# Altium PCB BOB_PAC5527.PcbDoc (part 3 of 3)
Units mm, origin at the board's own origin, x right, y up, seen from the top; angles counter-clockwise.
Board outline 40 x 40 mm, 2 copper layers (Top Layer, Bottom Layer), stack 1.448 mm thick; 84 components, 61 nets, 272 pads, 317 vias.
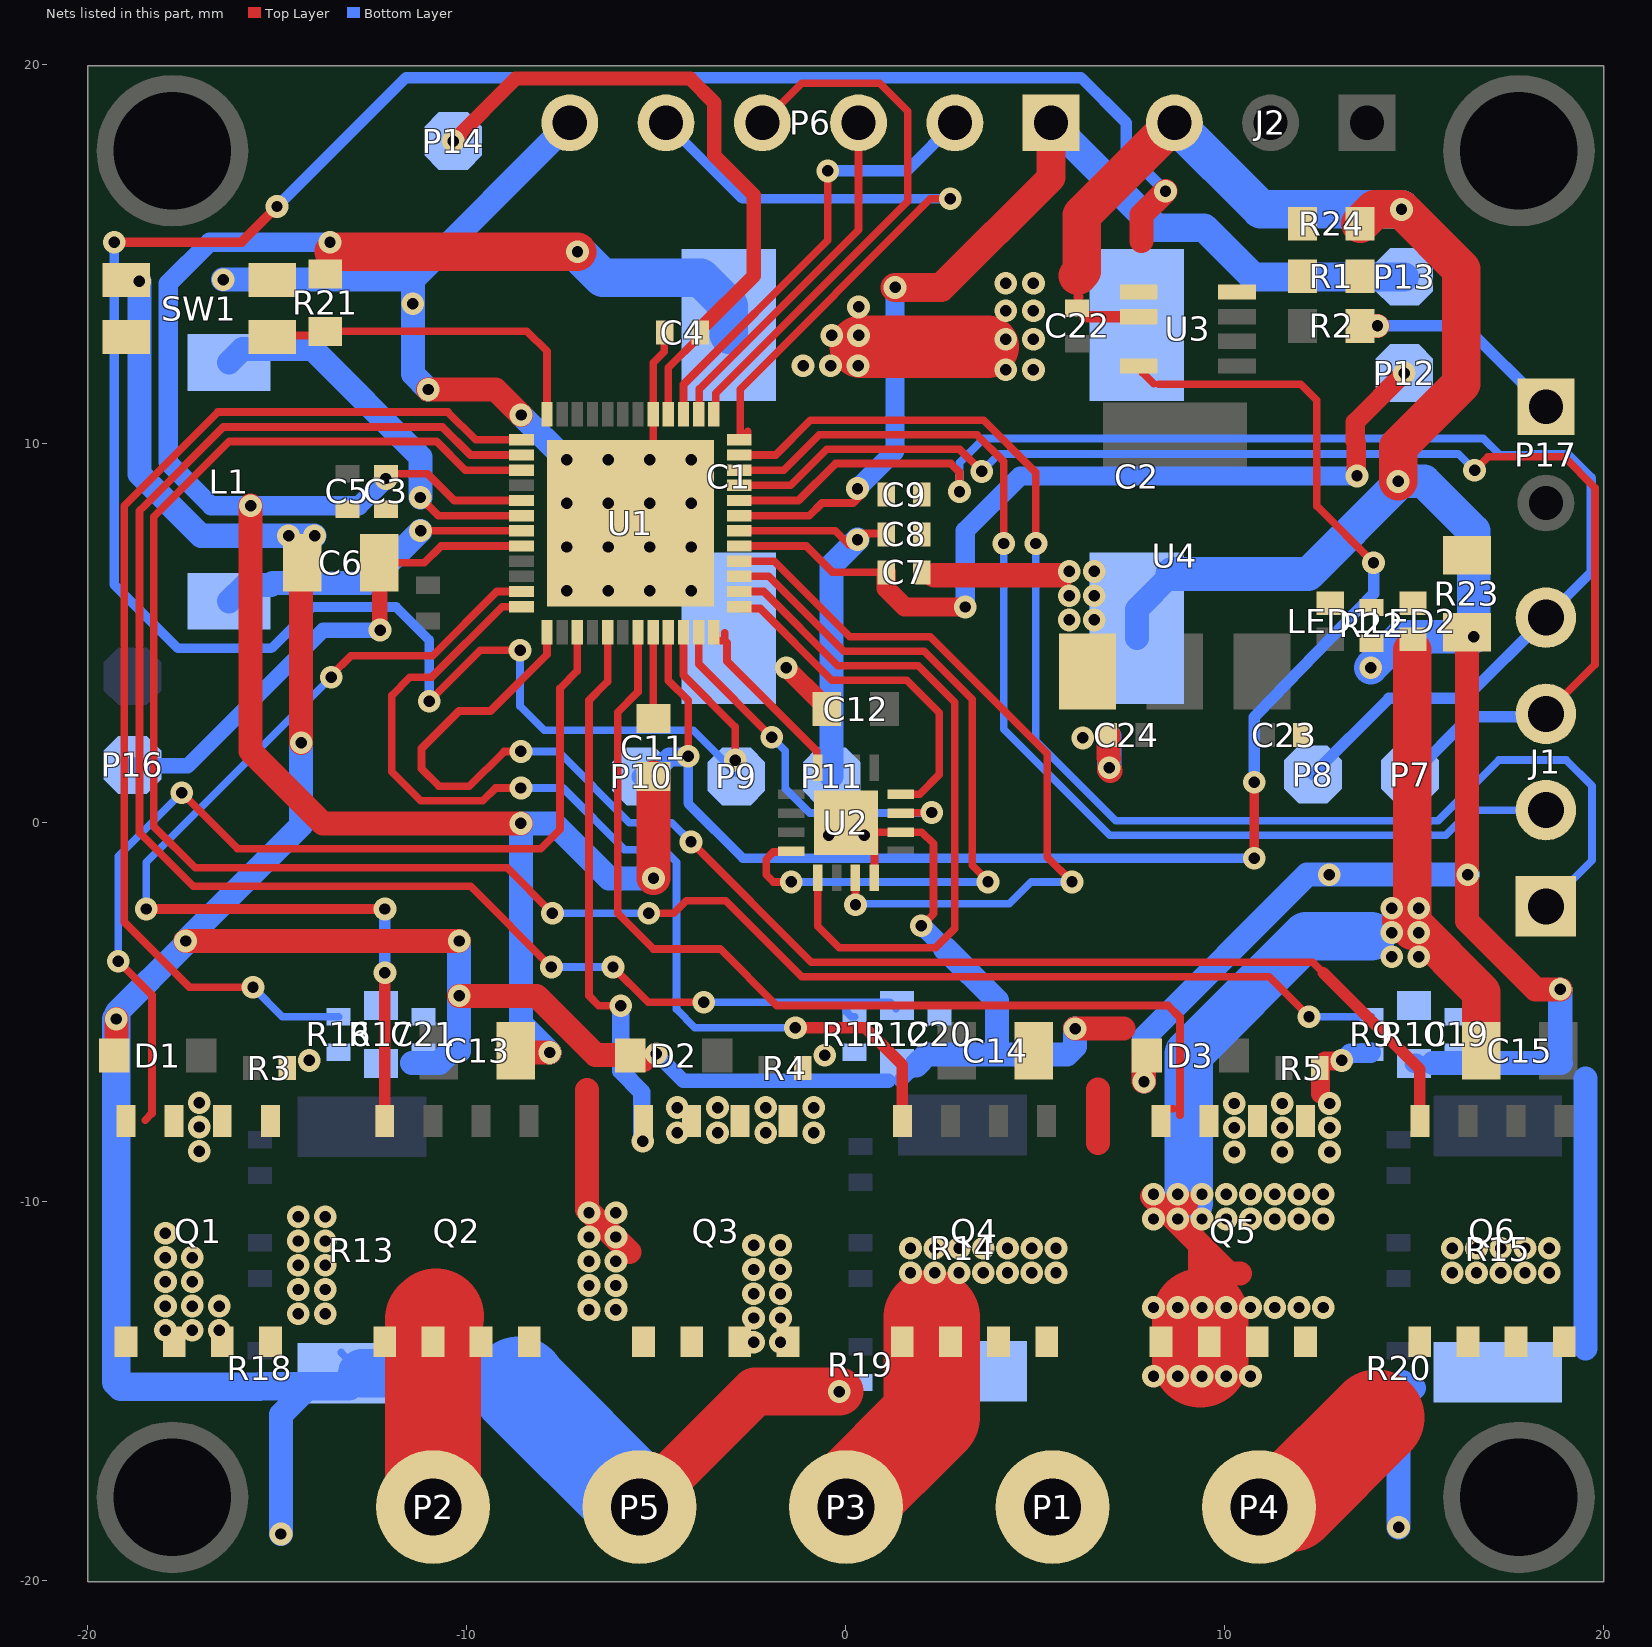
[diagram p2: the nets of this part, all layers, seen from the top]

## Via types
v1: diameter 0.6, hole 0.3, Top Layer to Bottom Layer, 182 vias
v2: diameter 0.6, hole 0.3, Top Layer to Bottom Layer, tented both sides, 135 vias

## Nets (pads, with @x,y where several pads share a name; then routed paths per layer and width w, separated by ;. In a path a pad name is that pad's centre, name@x,y a point inside that pad or via, vN(x,y) a via of type N, cw(c..) or ccw(c..) an arc to the next point about the centre after c; other vN are vias at no path point) (continued)
GND: C1.2 C2.2 C3.2 C4.2 C5.2 C6.2 C7.2 C8.2 C9.2 C12.2 C19.1 C20.1 C21.1 C22.2 C23.2 C24.2 D1.2 D2.2 D3.2 J2.3 P5.1 P6.6 R1.1 R10.2 R12.2 R13.2 R14.2 R15.2 R17.2 R18.1 R19.1 R20.1 R22.2 R23.2 R24.1 SW1.1 U1.5 U1.49 U2.8 U2.10 U2.17 U3.2 U4.1 | length 211.1
  Top Layer w0.203: U1.49@-5.688,8.226 U1.49@-5.088,8.826 ; U1.49@-5.088,8.499 U1.49@-5.088,8.826 ; C4.2@-4.794,13.086 -4.799,13.08 -4.799,12.425 -5.088,12.137 U1.5@-5.088,10.774 U1.49@-5.088,8.826 ; U2.17@-0.269,-0.212 U2.17@0.231,-0.712 ; U2.8@0.75,-1.45 0.75,-0.25 U2.10@1.45,-0.25 2.003,-0.25 2.311,-0.559 2.311,-2.4 v2(1.989,-2.723) ; 6.098,13.868 6.161,13.868
  Top Layer w0.305: C22.2@6.301,13.35 U3.2@7.724,13.35
  Top Layer w0.508: v2(-1.575,4.089) -0.673,3.188 -0.635,3.188 -0.508,3.061 C12.2@-0.508,3.023 ; v2(13.843,4.089) 13.868,4.089 v2@13.894,4.064 ; R23.2@16.383,4.621 16.385,4.623 16.385,4.726 v2(16.561,4.902)
  Top Layer w0.635: D1.2@-19.309,-6.147 -19.253,-6.091 v2(-19.253,-5.182) ; v2(-17.424,-3.124) v2(-10.206,-3.124) ; C6.2@-14.426,6.96 -14.376,6.91 v2(-14.376,2.108) ; v2(-11.024,11.43) -9.246,11.43 v2(-8.572,10.757) ; v2(-10.206,-4.569) -8.164,-4.569 -6.604,-6.129 -5.712,-6.129 D2.2@-5.695,-6.147 ; D2.2@-5.695,-6.236 -5.695,-6.261 D2.2@-5.339,-6.261 ; 2.318,6.528 v1@5.715,6.528 ; v2(6.045,-5.436) 7.325,-5.436 ; C24.2@6.921,2.311 6.921,1.718 v1@6.934,1.705 ; v1(6.945,1.448) 6.945,1.386 v1@6.972,1.359 ; v2(7.861,-6.833) 7.856,-6.827 7.856,-6.095 D3.2@7.882,-6.121 ; R23.2@16.383,4.621 16.383,-2.591 18.19,-4.398 v2(18.845,-4.398)
  Top Layer w1.016: 6.111,14.435 6.225,14.549 6.225,16.027 J2.3@8.663,18.466 J2.3@8.532,18.466 ; R24.1@13.566,15.799 13.947,16.18 v2(14.656,16.18) 16.231,14.605 16.231,11.582 14.567,9.919 v2(14.567,9.004)
  Top Layer w1.27: P5.1@-5.446,-18.059 -2.398,-15.011 v2(-0.178,-15.011)
  Bottom Layer w0.203: R13.2@-13.319,-13.983 R13.2@-12.774,-14.528
  Bottom Layer w0.381: v1(-5.004,-6.096) -4.293,-6.807 1.118,-6.807 ; 1.448,-6.794 1.854,-6.388
  Bottom Layer w0.508: v2(1.989,-2.723) 2.013,-2.723 2.618,-3.327 ; R10.2@14.986,-6.35 R10.2@15.05,-6.35 ; 18.845,-6.323 18.86,-6.337
  Bottom Layer w0.635: v2(-19.253,-5.182) -19.253,-5.029 -17.424,-3.2 v2(-17.424,-3.124) -14.376,-0.076 v2(-14.376,2.108) ; v2(-18.644,14.281) -18.644,9.195 -17.018,7.569 v2(-14.707,7.569) v2(-14.021,7.569) ; v2(-16.434,14.326) -11.428,14.326 ; R18.1@-15.481,-14.884 R18.1@-15.469,-14.872 ; v2(-14.91,-18.771) -14.91,-15.621 R13.2@-14.199,-14.91 ; R13.2@-13.118,-14.872 R13.2@-12.774,-14.528 ; -11.455,-6.337 -10.731,-6.337 -10.503,-6.109 ; v2(-11.024,11.43) -11.428,11.834 -11.428,13.663 -11.428,14.326 ; -10.206,-6.02 v2(-10.206,-4.569) v2(-10.206,-3.124) ; v2(-8.572,10.757) -7.391,9.576 v2(-7.364,9.576) ; P6.6@-7.288,18.466 -11.428,14.326 ; 1.854,-6.401 2.134,-6.121 3.981,-6.121 ; 2.618,-3.327 3.981,-4.691 3.981,-6.121 ; R14.2@2.707,-14.872 R14.2@3.075,-14.503 ; v2(6.045,-5.436) 6.045,-5.905 5.829,-6.121 3.981,-6.121 ; 6.921,2.311 6.945,2.288 v1(6.945,1.448) ; C2.2@7.673,4.877 C2.2@7.673,5.131 7.673,5.627 C2.2@8.605,6.559 ; v2(7.861,-6.833) 7.861,-5.679 12.168,-1.372 v2(12.751,-1.372) v2(16.408,-1.372) ; v2(14.58,-18.593) 14.58,-15.075 14.732,-14.922 14.986,-14.922 ; R20.1@14.681,-14.872 R20.1@14.681,-14.757 ; 15.494,-6.337 18.86,-6.337 ; 18.845,-6.323 v2(18.845,-4.398) ; 19.507,-13.87 19.507,-6.756
  Bottom Layer w0.762: v2(-19.253,-5.182) -19.253,-14.757 -19.126,-14.884 R18.1@-15.481,-14.884 ; R18.1@-15.469,-14.872 R13.2@-13.118,-14.872
  Bottom Layer w0.889: C2.2@8.605,6.559 12.197,6.559 14.567,8.929 v2(14.567,9.004) 15.253,9.004 16.561,7.696 v2(16.561,4.902) 14.656,4.902 v2(13.843,4.089)
  Bottom Layer w1.016: J2.3@8.663,18.466 10.949,16.18 v2(14.656,16.18)
  Bottom Layer w1.27: R13.2@-12.774,-14.528 -11.011,-14.528
  Bottom Layer w2.54: -8.636,-14.834 -8.636,-14.87 P5.1@-5.446,-18.059
  other v1: 6.248,2.235 5.893,5.35 6.553,5.35 5.893,5.99 6.553,5.99 5.893,6.629 6.553,6.629 -11.43,13.691
  other v2: -0.457,-0.335 0.483,-0.335 -7.364,6.121 -6.272,6.121 -5.18,6.121 -4.087,6.121 -7.364,7.273 -6.272,7.273 -5.18,7.273 -4.087,7.273 -7.364,8.424 -6.272,8.424 -5.18,8.424 -4.087,8.424 -6.272,9.576 -5.18,9.576 -4.087,9.576
HEADER_JUMPER: P17.1 R2.2 | length 5.8
  Top Layer w0.635: R2.2@13.566,13.106 v2(14.023,13.106)
  Bottom Layer w0.305: v2(14.023,13.106) 16.334,13.106 P17.1@18.468,10.973
MGH: U1.36 U2.16 | length 5
  Top Layer w0.203: U1.36@-3.488,5.024 -3.439,4.976 -3.439,4.801 -3.264,4.801 ; -3.201,5.002 -3.201,4.801 -3.193,4.801 -3.14,4.748 -3.14,4.258 -0.773,1.891 -0.773,1.473 U2.16@-0.75,1.45
MGL: U1.35 U2.11 | length 10.1
  Top Layer w0.203: U1.35@-3.888,5.024 -3.888,4.186 v2(-1.958,2.256) ; v2@-1.928,2.286 v2@-1.76,2.286 ; U2.11@1.509,0.252 1.516,0.259 2.255,0.259 v2(2.263,0.267)
  Bottom Layer w0.203: v2(-1.958,2.256) -1.6,1.898 -1.6,0.9 -0.954,0.254 2.25,0.254 v2(2.263,0.267)
NetLED1_2: LED1.2 R22.1
NetLED2_2: LED2.2 R23.1
PD6: P9.1 U1.34 U3.1 | length 68.1
  Top Layer w0.203: v2(-10.998,3.2) -9.652,4.547 v2(-8.599,4.547) ; U1.34@-4.288,5.024 -4.288,3.889 -2.921,2.522 v2(-2.921,1.651)
  Top Layer w0.254: v2(-19.304,15.316) -15.951,15.316 v2(-15.011,16.256)
  Top Layer w0.305: U3.1@7.724,14 U3.1@7.749,14.026
  Top Layer w0.635: 7.8,15.342 7.8,16.029 v2(8.431,16.661)
  Bottom Layer w0.203: v2(-8.599,4.547) -8.599,3.073 -7.964,2.438 -4.032,2.438 P9.1@-2.894,1.3
  Bottom Layer w0.254: v2(-19.304,15.316) -19.304,6.274 -17.628,4.597 -15.164,4.597 -14.072,5.69 -11.869,5.69 -10.998,4.819 v2(-10.998,3.2)
  Bottom Layer w0.305: v2(-15.011,16.256) -11.608,19.66 6.2,19.66 7.393,18.466 7.393,17.699 v2(8.431,16.661)
PD7: P10.1 U1.33 U3.4 | length 40.9
  Top Layer w0.203: U1.33@-4.688,5.024 -4.688,3.75 -4.166,3.228 v2(-4.166,1.753) ; U3.4@7.724,12.05 U3.4@8.002,12.05 ; U3.4@7.825,11.874 8.117,11.582 ; 8.257,11.57 11.997,11.57 12.421,11.146 12.421,8.357 v2(13.919,6.858)
  Top Layer w0.254: v2@10.77,-1.092 v2(10.77,-0.94) v2(10.77,1.067)
  Bottom Layer w0.254: v2(-4.166,1.753) -4.166,0.508 -2.718,-0.94 v2(10.77,-0.94)
  Bottom Layer w0.305: v2(10.77,1.067) 10.77,2.78 10.854,2.868 cw(c11.074,2.657) 10.856,2.87 13.919,6.042 v2(13.919,6.858)
  Bottom Layer w0.508: P10.1@-5.408,1.219 -5.176,1.219 -4.66,1.735 -4.183,1.735 v2(-4.166,1.753)
PE0: U1.37 U2.12 | length 9.3
  Top Layer w0.203: U1.37@-2.813,5.699 -2.764,5.651 -2.264,5.651 -0.372,3.759 1.6,3.759 2.464,2.896 2.464,1.27 1.947,0.753 1.453,0.753 U2.12@1.45,0.75
PE1: U1.38 U2.5 | length 18.2
  Top Layer w0.203: U1.38@-2.813,6.099 -2.173,6.099 -0.214,4.14 1.905,4.14 2.872,3.173 2.872,-2.792 2.362,-3.302 -0.178,-3.302 -0.744,-2.736 U2.5@-0.744,-1.483
PE2: U1.39 U2.4 | length 19.6
  Top Layer w0.203: U1.39@-2.813,6.499 -2.034,6.499 -0.056,4.521 2.063,4.521 3.327,3.257 3.327,-1.128 3.746,-1.547 v2(3.746,-1.564) ; U2.4@-1.45,-0.75 -1.473,-0.773 -1.916,-0.773 -2.106,-0.963 -2.106,-1.374 -1.916,-1.564 v2(-1.446,-1.564)
  Bottom Layer w0.203: v2@-1.435,-1.564 v2(3.746,-1.564)
PE3: U1.40 U2.7 | length 20.6
  Top Layer w0.203: U1.40@-2.813,6.899 -1.896,6.899 0.102,4.902 2.221,4.902 5.309,1.815 5.309,-0.908 v2(5.964,-1.564) ; U2.7@0.25,-1.45 U2.7@0.25,-1.45 0.251,-2.163 v2(0.252,-2.164) ; v2@0.251,-2.239 0.252,-2.24 v2@0.252,-2.316
  Bottom Layer w0.203: v2(0.252,-2.164) 0.273,-2.143 4.308,-2.143 4.888,-1.564 v2(5.964,-1.564)
PF0: P6.2 U1.3 | length 11.8
  Top Layer w0.203: U1.3@-4.288,10.998 -4.288,11.56 -0.481,15.367 v2(-0.481,17.196)
  Bottom Layer w0.203: P6.2@2.948,18.542 P6.2@2.948,18.61
  Bottom Layer w0.305: v2(-0.481,17.196) 1.602,17.196 P6.2@2.948,18.542
PF1: P6.3 U1.2 | length 9.4
  Top Layer w0.203: U1.2@-3.888,10.774 -3.869,10.793 -3.869,11.44 0.332,15.641 P6.3@0.332,18.466
PF2: P6.4 U1.1 | length 14.7
  Top Layer w0.203: U1.1@-3.488,10.774 -3.439,10.823 -3.439,11.33 1.628,16.397 1.628,18.765 0.886,19.507 -1.166,19.507 P6.4@-2.208,18.466
PF3: P6.5 U1.48 | length 17.5
  Top Layer w0.203: U1.48@-2.813,10.099 -2.638,10.099 -2.589,10.148 -2.589,10.323 ; -2.794,10.287 -2.794,11.437 2.228,16.459 v2(2.75,16.459)
  Bottom Layer w0.254: P6.5@-4.748,18.466 -2.741,16.459 v2(2.75,16.459)
PF4: J1.1 U1.47 | length 36
  Top Layer w0.203: U1.47@-2.813,9.699 -1.856,9.699 -0.938,10.617 3.632,10.617 5.011,9.239 v2(5.011,7.366)
  Bottom Layer w0.203: v2(5.011,7.366) 5.011,2.158 7.117,0.051 15.621,0.051 17.221,1.651 19.001,1.651 19.685,0.967 19.685,-0.993 J1.1@18.468,-2.21
PF5: J1.2 U1.46 | length 30.5
  Top Layer w0.203: U1.46@-2.813,9.299 -1.646,9.299 -0.709,10.236 3.454,10.236 4.162,9.528 v2(4.162,7.366)
  Bottom Layer w0.203: v2(4.162,7.366) 4.162,2.467 6.96,-0.33 15.824,-0.33 16.485,0.33 J1.2@18.468,0.33
PF6: J1.3 P7.1 U1.45 | length 34.8
  Top Layer w0.203: U1.45@-2.813,8.899 -1.462,8.899 -0.506,9.855 2.995,9.855 v2(3.583,9.268) ; v2(16.586,9.296) 16.942,9.652 18.948,9.652 19.761,8.839 19.761,4.164 J1.3@18.468,2.87
  Bottom Layer w0.203: v2(3.583,9.268) 4.043,9.728 16.154,9.728 v2(16.586,9.296)
  Bottom Layer w0.305: P7.1@14.911,1.246 16.459,2.794 18.392,2.794 J1.3@18.468,2.87
PF7: J1.4 P8.1 U1.44 | length 37
  Top Layer w0.203: U1.44@-2.813,8.499 -1.252,8.499 -0.277,9.474 2.769,9.474 2.994,9.249 v2(2.994,8.734)
  Bottom Layer w0.203: v2(2.994,8.734) 2.994,9.498 3.63,10.135 16.815,10.135 17.247,9.703 18.148,9.703
  Bottom Layer w0.254: 18.148,9.703 19.05,9.703 19.66,9.093 19.66,6.602 J1.4@18.468,5.41
  Bottom Layer w0.305: P8.1@12.319,1.27 14.326,3.277 16.334,3.277 J1.4@18.468,5.41
RESET: R21.2 SW1.2 U1.12 | length 9.2
  Top Layer w0.203: SW1.2@-15.142,12.852 -13.739,12.852 -13.625,12.967 -8.42,12.967 -7.888,12.434 U1.12@-7.888,10.774
RS: R1.2 R24.2 U3.8
SW1: L1.1 U1.18 | length 10.3
  Top Layer w0.203: v2(-11.232,8.578) -10.753,8.099 U1.18@-8.563,8.099
  Bottom Layer w0.635: L1.1@-16.279,12.142 -15.924,12.497 -14.072,12.497 -11.225,9.65 -11.225,8.585 v2(-11.232,8.578)
SW2: L1.2 U1.19 | length 8.5
  Top Layer w0.203: v2(-11.225,7.699) U1.19@-8.563,7.699
  Bottom Layer w0.635: L1.2@-16.279,5.842 -15.847,6.274 -15.175,6.274 -15.125,6.325 -12.6,6.325 v2(-11.225,7.699)
U_OUT: P2.1 Q1.1 Q1.2 Q1.3 Q2.5 Q2.6 Q2.7 Q2.8 R3.1 R16.2 | length 5.1
  Top Layer w2.54: P2.1@-10.895,-18.059 -10.895,-13.104 -10.82,-13.03
  other v1: -17.064,-8.671 -17.064,-8.031 -17.064,-7.391 -14.16,-6.274
UH: Q1.4 U1.27 | length 26
  Top Layer w0.203: v2(-19.202,-3.658) -18.313,-4.547 -18.313,-7.673 -18.489,-7.849 ; v2(-17.526,0.787) -16.053,-0.686 -8.052,-0.686 -7.544,-0.178 -7.544,3.548 -7.088,4.004 U1.27@-7.088,5.024
  Bottom Layer w0.203: v2(-19.202,-3.658) -19.202,-0.889 v2(-17.526,0.787)
UL: Q2.4 U1.23 | length 26
  Top Layer w0.203: v2(-13.581,3.835) -13.581,3.885 -13.061,4.405 -10.906,4.405 -9.211,6.099 U1.23@-8.563,6.099
  Top Layer w0.254: v2(-18.466,-2.278) v2(-12.167,-2.278)
  Top Layer w0.305: Q2.4@-12.17,-7.874 -12.17,-3.962 v2(-12.167,-3.959)
  Bottom Layer w0.203: v2(-18.466,-2.278) -18.466,-1.049 v2(-13.581,3.835)
  Bottom Layer w0.305: v2(-12.167,-3.959) v2(-12.167,-2.278)
UVDC: C21.2 R16.1 R17.1 U1.13 | length 29.5
  Top Layer w0.203: v2(-15.646,-4.343) -17.323,-4.343 -19.045,-2.621 -19.045,8.361 -16.573,10.833 -10.503,10.833 -9.769,10.099 U1.13@-8.563,10.099
  Bottom Layer w0.203: v2(-15.646,-4.343) -14.872,-5.118 R16.1@-13.386,-5.118
V_OUT: P3.1 Q3.1 Q3.2 Q3.3 Q4.5 Q4.6 Q4.7 Q4.8 R4.1 R11.2 | length 5.9
  Top Layer w2.54: P3.1@0.002,-18.059 0.002,-17.935 2.261,-15.676 2.261,-13.056
  other v1: 1.702,-11.879 2.342,-11.879 2.981,-11.879 3.621,-11.879 4.261,-11.879 4.901,-11.879 5.541,-11.879 1.702,-11.227 2.342,-11.227 2.981,-11.227 3.621,-11.227 4.261,-11.227 4.901,-11.227 5.541,-11.227 -4.45,-8.184 -3.388,-8.184 -2.118,-8.184 -0.848,-8.184 -4.45,-7.518 -3.388,-7.518 -2.118,-7.518 -0.848,-7.518
  other v2: -0.559,-6.139
VCC_1V8: C7.1 P12.1 U1.41 | length 23.1
  Top Layer w0.203: U1.41@-2.813,7.299 -1.051,7.299 -0.356,6.604 C7.1@1.061,6.604
  Top Layer w0.508: C7.1@1.061,6.604 1.061,6.178 1.549,5.69 v2(3.15,5.69) ; v2(13.483,9.149) 13.465,9.166 13.465,10.03 13.437,10.058 13.437,10.566 v2(14.732,11.862)
  Bottom Layer w0.508: v2(3.15,5.69) 3.15,7.699 4.599,9.149 v2(13.483,9.149)
VCC_3V3: C4.1 P14.1 U1.4 | length 17.4
  Top Layer w0.203: U1.4@-4.688,10.774 -4.688,11.998 -3.846,12.84 C4.1@-3.846,12.929
  Top Layer w0.305: C4.1@-3.846,12.929 C4.1@-3.846,13.018
  Top Layer w0.381: v2(-10.363,17.983) -8.712,19.634 -4.115,19.634 -3.48,18.999 -3.48,17.602 -2.438,16.561 -2.438,14.425 C4.1@-3.846,13.018
VCC_IO: C9.1 P6.1 P13.1 U1.43 | length 27.1
  Top Layer w0.203: U1.43@-2.813,8.099 -0.966,8.099 -0.633,8.433 0.191,8.433 0.376,8.618 0.305,8.689 v2(0.305,8.814)
  Top Layer w0.762: v2(1.295,14.122) 2.515,14.122 5.411,17.019 P6.1@5.412,18.466
  Bottom Layer w0.508: v2(0.305,8.814) 1.295,9.804 v2(1.295,14.122)
  Bottom Layer w0.762: P6.1@5.412,18.466 8.181,15.697 9.449,15.697 10.744,14.402 P13.1@14.732,14.402
VCC_VCORE: C8.1 P11.1 U1.42 | length 10.7
  Top Layer w0.203: U1.42@-2.813,7.699 -0.288,7.699 0.07,7.341 v2@0.076,7.341 ; v2@0.101,7.341 v2@0.076,7.341 ; v2@0.362,7.627 v2@0.076,7.341 ; v2@0.388,7.627 1.039,7.627 C8.1@1.061,7.606
  Bottom Layer w0.635: P11.1@-0.379,1.219 -0.379,6.784 v2(0.305,7.468)
VCP: C11.1 U1.32 | length 2.3
  Top Layer w0.203: U1.32@-5.088,5.024 -5.088,2.751 C11.1@-5.08,2.743
VH: Q3.4 U1.29 | length 15.1
  Top Layer w0.203: U1.29@-6.288,5.024 -6.288,3.726 -6.364,3.65 -6.782,3.232 -6.782,-4.568 -6.52,-4.83 v2(-5.946,-4.83)
  Top Layer w0.457: v1(-5.359,-8.407) -5.351,-8.399 -5.351,-7.883 Q3.4@-5.342,-7.874
  Bottom Layer w0.457: v2(-5.946,-4.83) -5.946,-6.551 -5.387,-7.11 -5.387,-8.38 v1(-5.359,-8.407)
VL: Q4.4 U1.24 | length 27.1
  Top Layer w0.203: v2(-8.577,0.914) -9.246,0.914 -9.584,0.576 -11.219,0.576 -11.989,1.346 -11.989,3.353 -11.506,3.835 -10.937,3.835 -9.073,5.699 U1.24@-8.563,5.699
  Top Layer w0.305: v2(-1.334,-5.41) 0.508,-5.41 1.485,-6.388 Q4.4@1.485,-7.874
  Bottom Layer w0.203: v2(-8.577,0.914) -7.468,0.914 -5.842,-0.711 -4.801,-0.711 -4.47,-1.041 -4.47,-4.926 -3.986,-5.41 v2(-1.334,-5.41)
VM: C1.1 C2.1 C3.1 C11.2 C13.2 C14.2 C15.2 LED2.1 P1.1 Q1.5 Q1.6 Q1.7 Q1.8 Q3.5 Q3.6 Q3.7 Q3.8 Q5.5 Q5.6 Q5.7 Q5.8 R21.1 U1.17 | length 97.6
  Top Layer w0.203: C3.1@-12.139,9.207 -11.042,9.207 -10.334,8.499 U1.17@-8.563,8.499
  Top Layer w0.635: v2(-15.71,8.364) -15.71,1.885 -13.804,-0.021 v2(-8.577,-0.021) ; C13.2@-8.71,-6.02 -8.665,-6.065 v1(-7.818,-6.065) ; -6.833,-7.05 -6.833,-10.211 -6.091,-10.953 -5.715,-11.328 ; C14.2@4.955,-6.02 4.955,-6.083 C14.2@5.145,-6.274 ; 6.655,-8.452 6.655,-7.042 ; v1@8.072,-9.869 9.347,-11.144 ; 8.966,-10.058 8.966,-10.033 ; v1@9.347,-13.03 9.347,-11.144 ; 10.396,-11.9 10.103,-11.9 9.347,-11.144
  Top Layer w0.889: v2(-5.08,-1.468) C11.2@-5.08,1.194
  Top Layer w1.016: v2@-13.513,15.062 v2(-7.085,15.062) ; 14.656,-2.565 v2@14.937,-2.847 ; LED2.1@14.937,4.547 14.937,-2.644 16.766,-4.472 C15.2@16.766,-5.857
  Top Layer w1.651: 0.391,12.555 3.74,12.555
  Top Layer w2.54: 9.347,-14.162 v1@9.347,-13.03
  Bottom Layer w0.508: v2(-13.614,15.316) -16.789,15.316 -17.882,14.224 -17.882,9.5 -16.746,8.364 v2(-15.71,8.364) -12.855,8.364 v2(-12.139,9.08)
  Bottom Layer w0.635: v1(-7.818,-6.065) -8.577,-5.305 v2(-8.577,-0.021) -7.701,-0.021 -6.253,-1.468 v2(-5.08,-1.468)
  Bottom Layer w1.016: v2@-7.085,15.037 -6.424,14.376 -3.833,14.376 -3.097,13.64 C1.1@-3.097,13.131 C1.1@-3.097,12.877
  Bottom Layer w1.27: 9.042,-10.033 9.042,-6.096 12.141,-2.997 13.859,-2.997
  other v1: 8.114,-14.604 8.753,-14.604 9.393,-14.604 10.033,-14.604 10.673,-14.604 -2.438,-13.71 -1.727,-13.71 -17.958,-13.395 -17.247,-13.395 -16.535,-13.395 -2.438,-13.07 -1.727,-13.07 -14.453,-12.959 -13.741,-12.959 -6.782,-12.852 -6.071,-12.852 8.114,-12.794 8.753,-12.794 9.393,-12.794 10.033,-12.794 10.673,-12.794 11.313,-12.794 11.952,-12.794 12.592,-12.794 -17.958,-12.756 -17.247,-12.756 -16.535,-12.756 -2.438,-12.43 -1.727,-12.43 -14.453,-12.319 -13.741,-12.319 -6.782,-12.213 -6.071,-12.213 -17.958,-12.116 -17.247,-12.116 -2.438,-11.79 -1.727,-11.79 -14.453,-11.679 -13.741,-11.679 -6.782,-11.573 -6.071,-11.573 -17.958,-11.476 -17.247,-11.476 -2.438,-11.151 -1.727,-11.151 -14.453,-11.039 -13.741,-11.039 -6.782,-10.933 -6.071,-10.933 -17.958,-10.836 8.114,-10.457 8.753,-10.457 9.393,-10.457 10.033,-10.457 10.673,-10.457 11.313,-10.457 11.952,-10.457 12.592,-10.457 -14.453,-10.4 -13.741,-10.4 -6.782,-10.293 -6.071,-10.293 8.114,-9.804 8.753,-9.804 9.393,-9.804 10.033,-9.804 10.673,-9.804 11.313,-9.804 11.952,-9.804 12.592,-9.804 4.218,11.951 4.944,11.951 -1.132,12.052 -0.406,12.052 0.319,12.052 4.218,12.754 4.944,12.754 -0.376,12.856 0.332,12.856 4.218,13.506 4.944,13.506 0.332,13.608 4.218,14.232 4.944,14.232
  other v2: 14.402,-3.54 15.113,-3.54 14.402,-2.9 15.113,-2.9 14.402,-2.261 15.113,-2.261
VP: C6.1 P16.1 U1.20 | length 13.8
  Top Layer w0.203: C6.1@-12.317,6.858 -11.125,6.858 -10.684,7.299 U1.20@-8.563,7.299
  Top Layer w0.406: C6.1@-12.317,6.858 -12.305,6.846 -12.305,5.092 v2(-12.294,5.08)
  Bottom Layer w0.406: P16.1@-18.827,1.524 -18.801,1.499 -17.374,1.499 -13.792,5.08 v2(-12.294,5.08)
VVDC: C20.2 R11.1 R12.1 U1.14 | length 42
  Top Layer w0.203: U1.14@-8.563,9.699 -9.908,9.699 -10.648,10.439 -16.428,10.439 -18.517,8.351 -18.644,8.224 -18.644,-0.259 -18.517,-0.386 -17.227,-1.676 -9.906,-1.676 v2(-7.772,-3.81) ; v2(-6.147,-3.81) -5.216,-4.74 v2(-3.75,-4.74)
  Bottom Layer w0.203: v2(-7.772,-3.81) v2(-6.147,-3.81) ; v2(-3.75,-4.74) 1.16,-4.74 R12.1@1.322,-4.902 ; R11.1@0.013,-4.902 0.013,-4.991 0.14,-5.118 R11.1@0.229,-5.118
W_OUT: P4.1 Q5.1 Q5.2 Q5.3 Q6.5 Q6.6 Q6.7 Q6.8 R5.1 R9.2 | length 6.3
  Top Layer w0.508: 12.517,-7.15 12.517,-6.421 12.646,-6.291 13.063,-6.291 v1(13.081,-6.274)
  Top Layer w2.54: P4.1@10.899,-18.059 10.987,-17.971 11.721,-17.971 13.995,-15.697
  Bottom Layer w0.508: v1(13.081,-6.274) 13.106,-6.274 13.296,-6.083 13.843,-6.083 R9.2@13.868,-6.058
  other v1: 15.997,-11.879 16.636,-11.879 17.276,-11.879 17.916,-11.879 18.556,-11.879 15.997,-11.227 16.636,-11.227 17.276,-11.227 17.916,-11.227 18.556,-11.227 10.241,-8.692 11.511,-8.692 12.76,-8.692 10.241,-8.052 11.511,-8.052 12.76,-8.052 10.241,-7.412 11.511,-7.412 12.76,-7.412
WH: Q5.4 U1.31 | length 26.8
  Top Layer w0.203: U1.31@-5.488,5.024 -5.488,3.448 -6.02,2.916 -6.02,-2.394 -5.082,-3.332 -3.323,-3.332 -1.829,-4.826 6.945,-4.826 8.5,-4.826 8.814,-5.14 8.814,-7.722 ; Q5.4@8.313,-7.874 8.313,-7.699 8.461,-7.551 8.636,-7.551
WL: Q6.4 U1.25 | length 37.2
  Top Layer w0.203: v2(-8.577,1.88) -8.581,1.875 -9.021,1.875 -9.939,0.957 -10.736,0.957 -11.201,1.422 -11.201,1.956 -10.211,2.946 -9.38,2.946 -7.888,4.439 U1.25@-7.888,5.024 ; v2(-4.089,-0.508) -0.914,-3.683 12.315,-3.683 12.596,-3.965
  Top Layer w0.305: 12.596,-3.965 15.14,-6.509 Q6.4@15.14,-7.874
  Bottom Layer w0.203: v2@-8.581,1.88 v2(-8.577,1.88) -7.595,1.88 -5.715,0 -4.597,0 v2(-4.089,-0.508)
WVDC: C19.2 R9.1 R10.1 U1.15 | length 53.5
  Top Layer w0.203: U1.15@-8.563,9.299 -10.047,9.299 -10.806,10.058 -16.271,10.058 -18.263,8.066 -18.263,-0.102 -17.17,-1.194 -8.941,-1.194 v2(-7.747,-2.388) ; v2(-5.207,-2.388) -4.547,-2.388 -4.216,-2.057 -3.175,-2.057 -1.168,-4.064 11.163,-4.064 v2@12.205,-5.105
  Bottom Layer w0.203: v2(-7.747,-2.388) v2(-5.207,-2.388) ; v2(12.217,-5.118) R9.1@13.868,-5.118
pads on no net: U2.1 U2.2 U2.3 U2.6 U2.9 U2.14 U2.15 U3.5

## Polygon pours and split planes (outlines as drawn)
GND on Top Layer "GND_L01_P000" (solid, remove dead copper, pour order 0): -20,19.964 20,19.964 20,-20.036 -20,-20.036
GND on Bottom Layer "GND_L02_P001" (solid, remove dead copper, pour order 1): -20,19.964 20,19.964 20,-20.036 -20,-20.036

## Other copper
Top Layer:
  region net VM: -6.604,-9.121 -6.604,-10.741 -2.184,-10.741 -2.184,-9.121
  region net VM: -5.842,-7.087 -7.163,-7.087 -7.163,-10.922 -5.842,-10.922
  region net VM: -6.893,-7.96 -6.185,-7.252 -8.243,-5.194 -8.952,-5.902
  rectangle net GND: 5.422,2.54 7.276,7.032
  region net GND: -2.032,-19.864 -2.032,-14.351 -7.023,-14.351 -7.023,-19.864
  region net VM: 7.112,-19.809 7.112,-18.19 3.454,-18.19 3.454,-19.809
  region net VM: 6.613,-17.288 4.988,-15.662 2.464,-18.186 4.089,-19.812
  rectangle net W_OUT: 9.296,-19.787 12.802,-16.713
  region net W_OUT: 17.723,-14.122 15.58,-11.979 9.931,-17.628 12.074,-19.771
  region net VM: 11.541,-14.081 9.893,-12.433 4.178,-18.148 5.826,-19.796
  region net VM: 9.391,-13.741 8.163,-12.513 3.416,-17.259 4.645,-18.488
  region net V_OUT: 5.966,-13.967 4.821,-12.822 -0.653,-18.296 0.492,-19.44
  rectangle net VM: -7.163,-14.122 -1.219,-9.931
  region net V_OUT: 1.557,-10.686 2.438,-9.804 -0.278,-7.088 -1.16,-7.969
  rectangle net V_OUT: 0.389,-14.249 6.045,-9.22
  rectangle net V_OUT: -4.851,-8.814 -0.178,-7.137
  region net VM: 8.014,-10.604 8.941,-9.677 7.185,-7.922 6.258,-8.849
  region net VM: 7.188,-5.944 6.248,-5.944 6.248,-9.004 7.188,-9.004
  rectangle net AIO10: -11.255,-9.093 -8.052,-7.061
  rectangle net VM: -19.785,-15.57 -14.392,-9.551
  region net VM: -13.782,-11.343 -13.106,-10.668 -14.373,-9.401 -15.049,-10.076
  rectangle net VM: -15.062,-15.57 -13.208,-10.566
  rectangle net 5VSYS: -13.562,8.915 -12.749,9.779
  rectangle net GND: 1.678,6.198 2.489,9.195
  region net GND: 14.224,1.803 14.224,2.692 11.786,2.692 11.786,1.803
  rectangle net VM: 14.021,-3.937 15.545,-1.854
  rectangle net GND: 7.38,-7.199 8.384,-5.876
  region net GND: 7.061,-5.105 7.061,-5.766 8.384,-5.766 8.384,-5.105
  rectangle net AIO32: 2.311,-8.941 6.057,-7.137
  region net VM: 6.985,-6.883 6.985,-5.944 4.447,-5.944 4.447,-6.883
  rectangle net WH: 8.001,-8.484 9.017,-7.391
  rectangle net 3V3_LDO: 5.639,-0.635 9.525,0.864
  rectangle net 3V3_LDO: 0.61,1.118 1.499,3.429
  rectangle net GND: -19.761,-6.731 -18.771,-4.75
  rectangle net GND: -6.35,-6.833 -4.532,-5.69
  rectangle net V_OUT: -1.492,-8.255 -0.178,-5.918
  rectangle net U_OUT: -15.093,-8.255 -13.779,-5.74
  region net AIO54: 19.787,-5.182 18.285,-5.182 18.285,-9.068 19.787,-9.068
  region net AIO54: 19.306,-7.112 15.57,-7.112 15.57,-9.068 19.306,-9.068
  region net MGH: -2.83,4.647 -2.83,5.358 -3.52,5.358 -3.52,4.647
  region net W_OUT: 14.747,-10.963 15.961,-9.749 13.012,-6.8 11.798,-8.014
  region net U_OUT: -12.509,-10.909 -11.316,-9.716 -14.032,-6.999 -15.226,-8.193
  rectangle net W_OUT: 13.894,-14.249 19.865,-9.551
  rectangle net VM: 6.807,-14.249 13.037,-9.525
  rectangle net U_OUT: -12.728,-19.71 -7.445,-9.423
  rectangle net 3V3_LDO: 5.537,7.315 11.074,11.227
  rectangle net HEADER_JUMPER: 13.157,12.624 14.427,13.564
  rectangle net VCC_VCORE: -0.305,7.112 1.321,7.925
  rectangle net 5VSYS: 9.728,1.854 11.455,5.893
  rectangle net 5VSYS: 9.779,4.801 12.09,5.893
  rectangle net GND: 5.664,1.041 7.29,7.036
  rectangle net 5VSYS: 10.16,1.854 11.506,3.683
  rectangle net 5VSYS: 10.162,2.87 13.185,5.182
  rectangle net RESET: -19.734,12.319 -13.005,13.36
  rectangle net VM: -14.199,14.072 -13.03,15.646
  rectangle net PF3: -3.15,10.033 -2.438,10.541
  rectangle net GND: -15.164,5.944 -13.689,7.976
  rectangle net GND: -15.164,7.849 -11.809,8.458
  rectangle net UH: -19.404,-9.017 -18.212,-7.417
  rectangle net AIO32: 2.311,-8.941 3.421,-5.182
  rectangle net AIO10: -11.255,-8.941 -10.234,-5.182
  rectangle net DRSW: 9.647,-6.807 11.806,-5.385
  rectangle net DRSV: -4.113,-6.807 -1.827,-5.283
  rectangle net W_OUT: 9.227,-9.119 12.885,-7.01
  rectangle net W_OUT: 12.148,-8.255 13.462,-5.918
  rectangle net GND: -19.683,13.868 -14.476,14.757
  rectangle net VCC_IO: -0.139,8.103 1.323,9.195
  rectangle net PD7: 7.216,11.405 8.435,12.268
  rectangle net RS: 9.806,13.767 12.423,14.453
  rectangle net GND: 7.546,17.323 9.451,19.609
  rectangle net NetLED1_2: 12.372,5.41 14.226,6.375
  rectangle net GND: 13.411,1.981 14.226,5.156
  rectangle net VM: 14.429,4.343 15.445,5.156
  rectangle net GND: 15.75,-2.261 17.02,5.537
  region net NetLED2_2: 15.471,7.569 14.455,7.569 14.455,5.461 15.471,5.461
  rectangle net PD6: 7.216,13.792 8.28,15.646
  rectangle net GND: 12.829,13.767 14.099,16.713
  rectangle net GND: 5.552,13.183 6.733,15.672
  rectangle net NetLED2_2: 14.455,6.477 17.096,7.569
  rectangle net 3V3_LDO: 5.537,12.471 8.232,12.903
  rectangle net 3V3_LDO: 5.537,9.017 9.654,11.227
  rectangle net 3V3_LDO: 5.537,8.636 6.758,12.751
  rectangle net RS: 11.559,13.767 12.473,16.434
  rectangle net 3V3_LDO: 7.571,0.5 9.525,10.262
  rectangle net GND: 7.379,-6.655 8.384,-5.588
  rectangle net U_OUT: -18.009,-8.89 -14.425,-6.985
  rectangle net DRSU: -17.6,-6.807 -15.441,-4.902
  region net VM: 0.203,13.843 -1.626,12.014 -1.626,11.709 0.686,11.709 0.686,13.843 0.483,13.843
  region net VM: 5.309,14.58 5.309,11.557 3.81,11.557 3.81,14.58
Bottom Layer:
  rectangle net UVDC: -15.977,-5.41 -15.259,-4.039
  region net W_OUT: 18.872,-12.261 18.872,-10.871 15.57,-10.871 15.57,-12.261
  region net V_OUT: 5.969,-12.261 5.969,-10.871 1.245,-10.871 1.245,-12.261
  region net VM: 13.03,-14.986 13.03,-12.37 7.645,-12.37 7.645,-14.986
  region net VM: 13.056,-10.795 13.056,-9.451 7.696,-9.451 7.696,-10.795
  region net GND: -18.597,-15.568 -18.597,-4.75 -19.791,-4.75 -19.791,-15.568
  rectangle net AIO32: 0.051,-8.763 6.071,-7.214
  rectangle net AIO10: -14.732,-9.576 -8.611,-7.442
  rectangle net U_OUT: -17.589,-9.017 -16.231,-7.053
  rectangle net AIO3: -0.635,-11.557 0.864,-10.871
  region net VM: -6.782,-11.887 -7.709,-12.814 -4.128,-16.396 -3.2,-15.469
  region net VM: -0.914,-16.332 -0.914,-14.092 -4.216,-14.092 -4.216,-16.332
  region net VM: -0.914,-14.503 -0.914,-10.846 -5.969,-10.846 -5.969,-14.503
  region net VM: 7.399,-16.332 7.399,-15.547 -3.327,-15.547 -3.327,-16.332
  rectangle net VM: 3.353,-19.736 7.391,-15.621
  rectangle net AIO2: -0.61,-14.173 0.84,-11.76
  rectangle net GND: 1.219,-15.316 6.096,-12.7
  region net VM: -5.74,-9.982 -14.783,-9.982 -14.783,-13.233 -5.74,-13.233
  rectangle net V_OUT: -4.851,-8.661 -0.483,-7.188
  region net VM: 6.481,14.884 3.865,14.884 3.865,11.557 6.481,11.557
  rectangle net VM: -1.93,11.735 0.686,15.062
  rectangle net VM: 13.767,-3.937 15.545,-1.88
  rectangle net W_OUT: 9.906,-9.093 13.106,-6.985
  rectangle net 3V3_LDO: 7.544,1.067 9.525,2.692
  region net GND: 9.5,7.137 5.715,7.137 5.715,2.87 9.5,2.87
  rectangle net V_OUT: -0.864,-6.426 0.635,-5.613
  rectangle net WVDC: 11.913,-5.41 16.436,-4.394
  rectangle net VVDC: -0.152,-5.41 2.796,-4.394
  rectangle net UVDC: -15.926,-5.41 -10.818,-4.47
  rectangle net GND: -14.501,-15.799 -7.798,-13.513
  rectangle net GND: -19.736,-15.57 -14.239,-14.376
  rectangle net GND: 14.529,-6.883 19.837,-5.791
  rectangle net GND: 0.889,-6.985 6.401,-5.588
  rectangle net GND: -12.725,-6.883 -9.881,-5.791
  rectangle net U_OUT: -14.491,-6.706 -12.992,-5.74
  rectangle net W_OUT: 12.751,-6.706 14.249,-5.74
  rectangle net GND: -0.584,-15.342 5.715,-14.402
  rectangle net GND: 14.148,-15.392 15.824,-14.453
  rectangle net AIO54: 14.15,-8.865 18.923,-7.112
  rectangle net AIO5: 14.122,-11.328 15.039,-9.093
  rectangle net AIO1: -15.926,-11.328 -15.009,-9.068
  rectangle net AIO0: -15.928,-14.173 -15.011,-11.76
  rectangle net GND: 5.715,1.905 7.29,3.327
  rectangle net GND: -7.925,2.794 -0.889,9.931
  rectangle net 3V3_LDO: 5.588,7.341 10.998,8.687
  rectangle net AIO10: -15.898,-8.839 -8.611,-7.112
  region net VM: 8.917,14.884 5.537,14.884 5.537,11.151 8.917,11.151
  rectangle net VM: -6.604,10.871 -1.778,15.088
  rectangle net GND: 15.471,-15.392 19.837,-12.852
  rectangle net AIO4: 14.122,-14.173 15.039,-11.76
  region net VM: -18.39,-9.804 -16.154,-12.119 -16.154,-13.956 -18.39,-13.956 -18.39,-13.855
  region net 5VSYS: 11.125,2.657 12.888,4.42 13.183,4.42 13.183,2.657 11.125,2.657 11.125,2.464
  region net 5VSYS: 9.703,2.173 11.836,4.382 11.836,5.893 9.703,5.893 9.703,5.791

## Silkscreen, mask and mechanical layers (free items; w line width, h text height)
Top Overlay:
  text "*" at 6.35,12.693 h1.52 r180
  text "*" at -11.913,10.686 h1.52 r180
  text "#" at 1.631,2.672 h1.02
  text "Note:" at -19.843,0.865 h1.4
  text "#" at -5.309,-0.091 h1.02
  text "*>> 1uF 0402" at -19.843,-0.67 h1.4
  text "#>>1uF 0603" at -19.843,-2.202 h1.4
  text "U" at -12.395,-16.477 h1.65
  text "W" at 9.398,-16.477 h1.65
  text "V" at -1.499,-16.502 h1.65
  text "VM" at 3.95,-16.502 h1.65
  text "GND" at -7.304,-16.574 h1.78
Bottom Overlay:
  text "3V3" at -11.353,17.445 h1.27
  text "VCC_IO" at 16.294,15.28 h1.27
  text "1V8" at 15.8,9.825 h1.27
  text "5VSYS" at -13.578,3.323 h1.27
  text "VP" at -13.603,0.961 h1.27
  text "PF7" at 13.441,-0.767 h1.27
  text "PF6" at 16.005,-0.767 h1.27
  text "PD7" at -5.948,-2.004 h1.27 r270
  text "PD6" at -3.459,-2.06 h1.27 r270
  text "VCORE" at -0.919,-4.025 h1.27 r270
Board Outline:
  lines w0.254: -20,-20.036 -20,19.964 20,19.964 20,-20.036 -20,-20.036 ; 0,-20.036 0,-20.036

## Dimensions
-20,-20.036 to 20,-20.036 on Dimension
-20,19.964 to -20,-20.036 on Dimension